# Altium PCB OpenRex_V1I1_PCB.PcbDoc (part 6 of 12)
Units mm, origin at the board's own origin, x right, y up, seen from the top; angles counter-clockwise.
Board outline 70 x 95 mm, 10 copper layers (L1, L2, L3, L4 (PWR), L5 (PWR), L6 (PWR), L7 (PWR), L8, L9, L10), stack 1.632 mm thick; 1080 components, 708 nets, 3831 pads, 2373 vias.
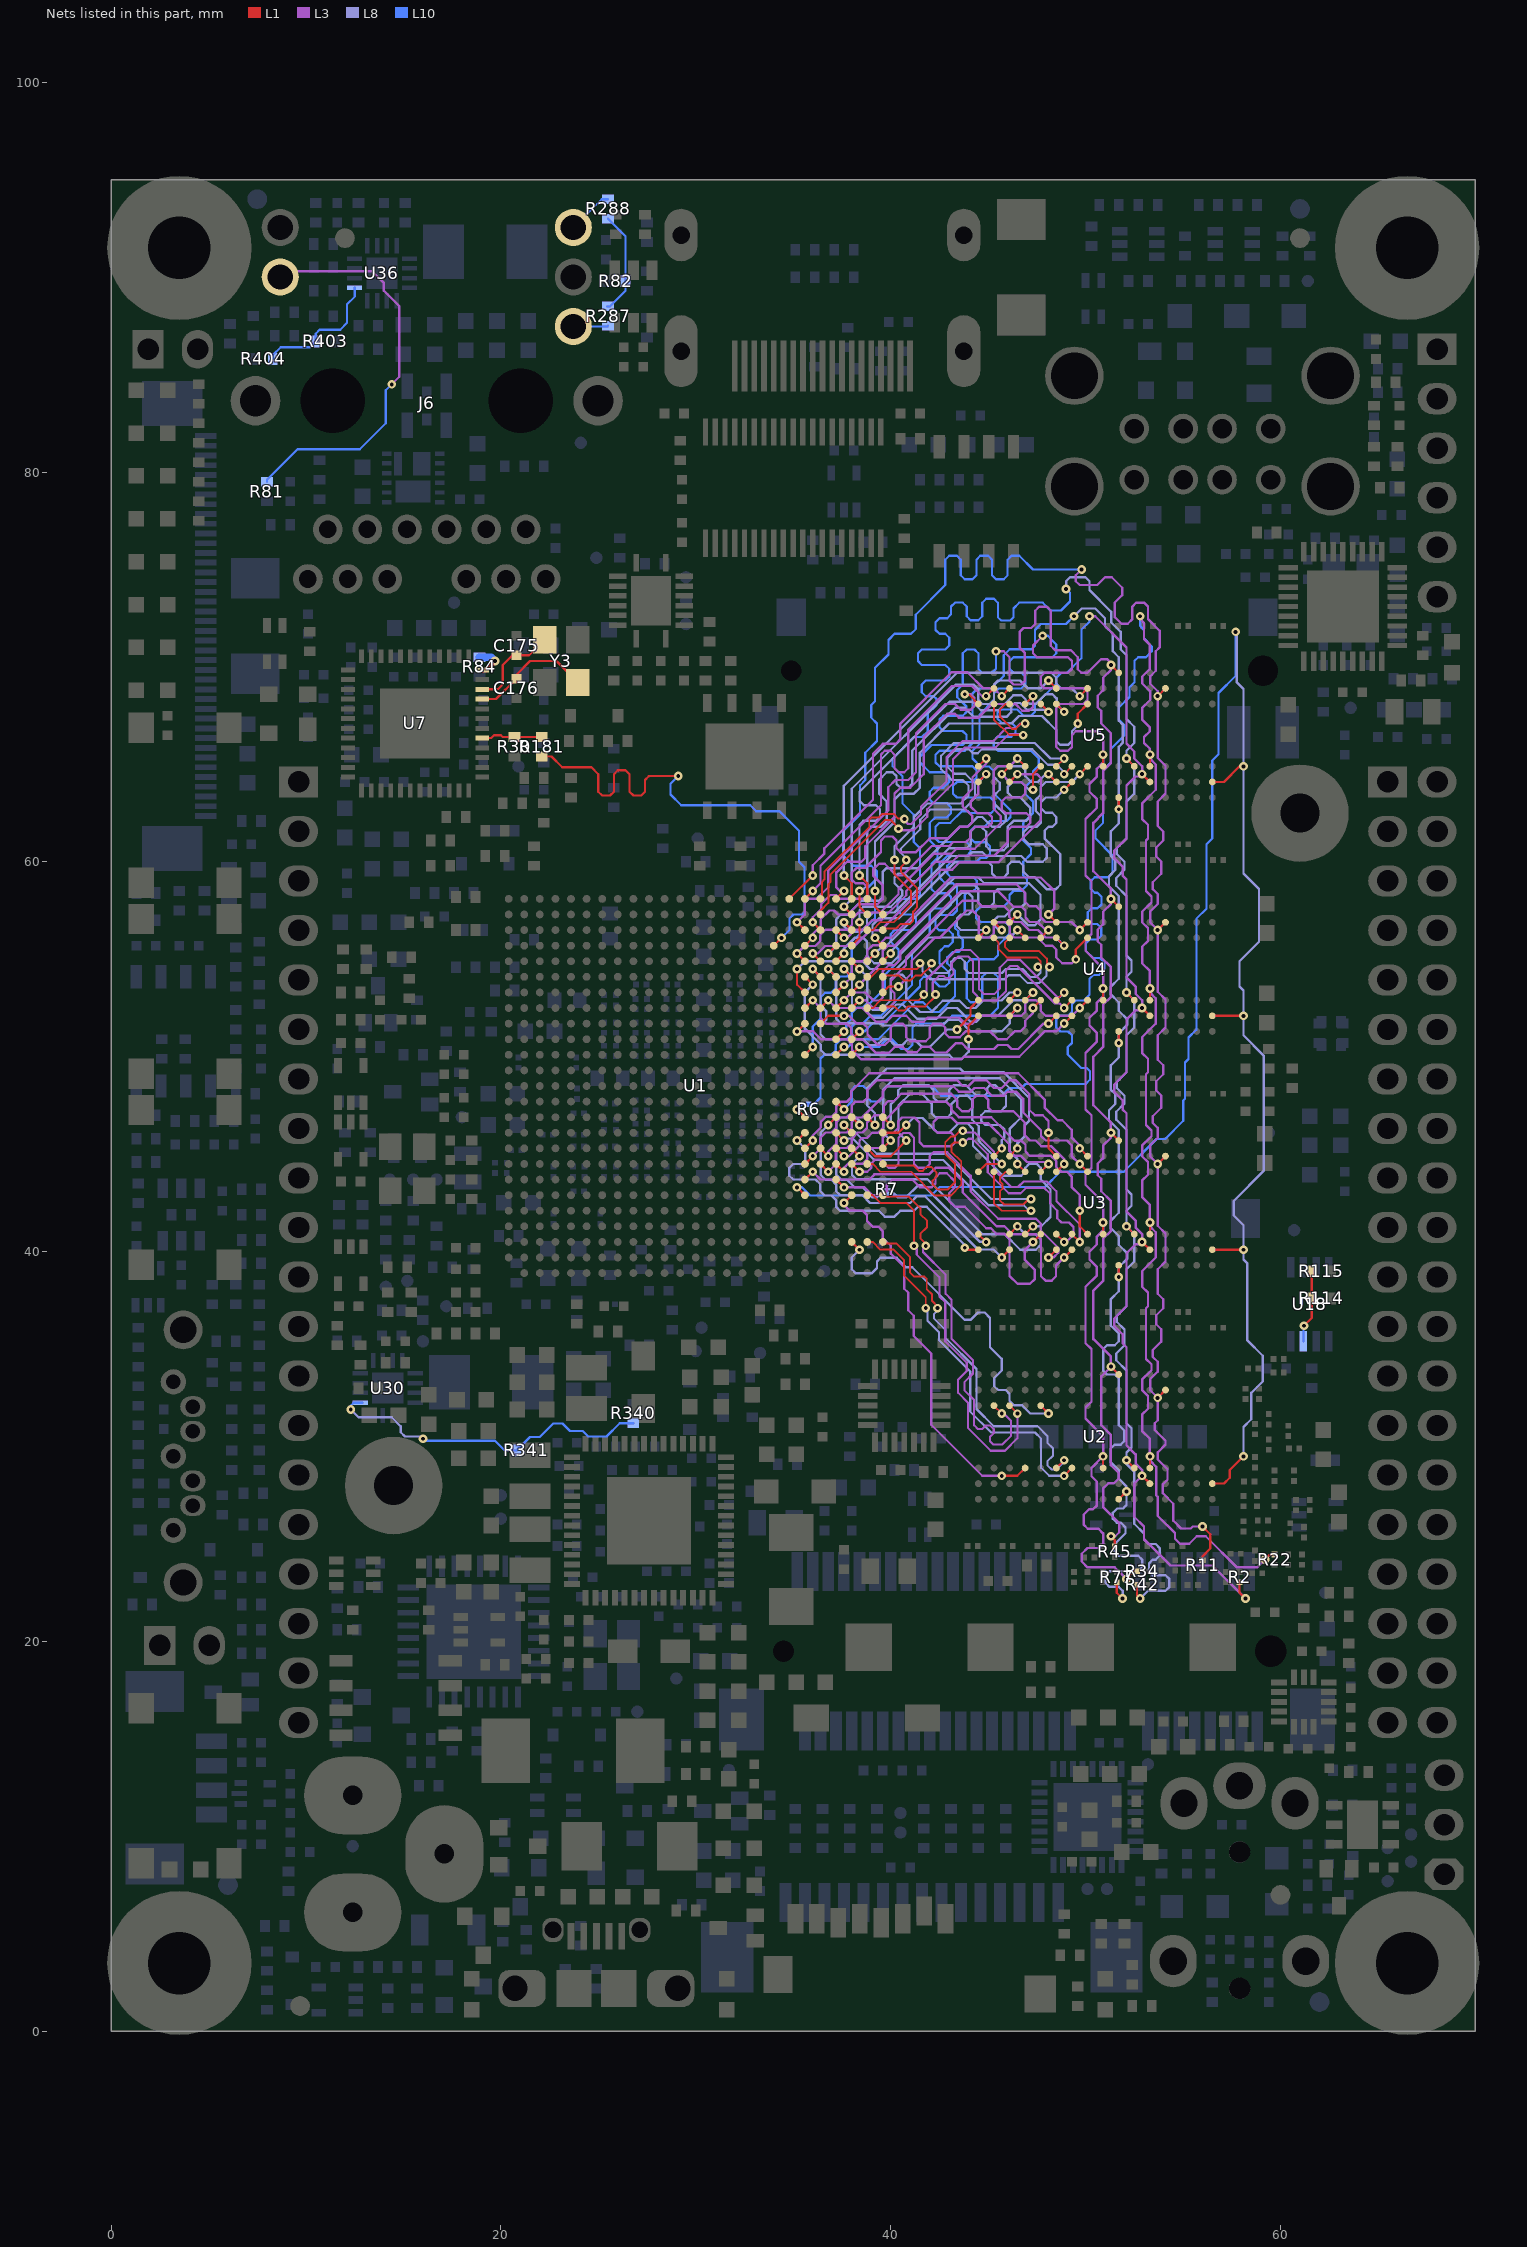
[diagram p14: the nets of this part, all layers, seen from the top]

## Via types
v1: diameter 0.45, hole 0.2, L1 to L10, tented both sides, 2369 vias
v2: diameter 1, hole 0.5, L1 to L10, tented top, 4 vias

## Nets (pads, with @x,y where several pads share a name; then routed paths per layer and width w, separated by ;. In a path a pad name is that pad's centre, name@x,y a point inside that pad or via, vN(x,y) a via of type N, cw(c..) or ccw(c..) an arc to the next point about the centre after c; other vN are vias at no path point) (continued)
DRAM_D16: U1.AB7 U3.E3 | length 19.1
  L1 w0.114: U1.AB7@37.2,43.7 v1(37.6,43.3) ; v1(47.3,40.5) U3.E3@47.7,40.9
  L3 w0.12: v1(37.6,43.3) 38.656,43.3 39.056,42.9 39.6,42.9 39.793,43.093 39.793,43.393 40.085,43.685 41.115,43.685 41.5,43.3 42.1,43.3 42.3,43.5 42.3,43.8 42.52,44.02 42.88,44.02 43.3,43.6 43.3,43.3 43,43 43,42.6 43.3,42.3 43.8,42.3 44.9,41.2 45.14,41.2 45.418,40.922 45.822,40.922 46.1,40.644 46.1,38.756 46.506,38.35 47.15,38.35 47.4,38.6 47.4,39.055 46.885,39.571 46.885,40.085 v1(47.3,40.5)
DRAM_D17: U1.AA8 U3.F7 | length 19.1
  L1 w0.114: U1.AA8@36.4,44.5 v1(36.8,44.1) ; U3.F7@48.5,44.1 v1(48.9,44.5)
  L3 w0.12: v1(36.8,44.1) 37.185,44.485 37.185,45.085 37.415,45.315 37.759,45.315 38.009,45.565 38.009,45.809 38.315,46.115 38.559,46.115 38.785,46.341 38.785,46.629 39.156,47 39.5,47 39.656,47.156 39.656,47.5 39.871,47.715 40.159,47.715 40.544,48.1 43.1,48.1 43.415,47.785 43.415,47.441 43.656,47.2 44,47.2 44.215,47.415 44.215,47.815 44.385,47.985 44.815,47.985 45,47.8 45,47.4 45.2,47.2 46.3,47.2 46.885,46.615 46.885,45.971 47.155,45.7 47.444,45.7 47.685,45.459 47.744,45.4 48.255,45.4 48.9,44.755 v1(48.9,44.5)
DRAM_D18: U1.AB9 U3.H3 | length 19.1
  L1 w0.114: U1.AB9@37.2,45.3 v1(37.6,44.9) ; v1(49.7,42.1) 49.7,41.3 U3.H3@50.1,40.9
  L3 w0.12: v1(37.6,44.9) 37.856,44.9 38.4,45.444 38.4,45.7 38.535,45.835 38.791,45.835 39.056,46.1 39.344,46.1 39.615,46.371 39.615,46.659 40.656,47.7 42.844,47.7 43.1,47.444 43.1,47.3 43.5,46.9 45.155,46.9 46.371,45.685 46.715,45.685 46.915,45.485 46.915,45.141 47.141,44.915 48.229,44.915 48.5,44.644 48.5,44.356 48.771,44.085 49.059,44.085 49.285,43.859 49.285,43.315 49.7,42.9 v1(49.7,42.1)
DRAM_D19: U1.Y9 U3.H8 | length 19.1
  L1 w0.114: U1.Y9@35.6,45.3 v1(36,45.7) ; v1(49.7,45.3) U3.H8@50.1,44.9
  L3 w0.12: v1(36,45.7) 36,45.956 36.415,46.371 36.415,46.659 36.671,46.915 36.959,46.915 37.215,47.171 37.215,47.459 37.441,47.685 37.729,47.685 37.985,47.941 37.985,48.229 38.906,49.15 46.55,49.15 47.9,47.8 47.9,47.4 48.556,46.744 48.8,46.744 49.285,46.259 49.285,45.855 49.7,45.44 v1(49.7,45.3)
DRAM_D20: U1.Y7 U3.G2 | length 19.1
  L1 w0.114: U1.Y7@35.6,43.7 v1(36,44.1) ; v1(48.9,39.7) U3.G2@49.3,40.1
  L3 w0.12: v1(36,44.1) 36.4,43.7 38.9,43.7 39.165,43.965 41.965,43.965 42.3,44.3 43,44.3 43.7,43.6 43.7,43.036 45.436,41.3 45.84,41.3 46.255,40.885 47.459,40.885 47.715,40.629 47.715,38.741 47.941,38.515 48.259,38.515 48.485,38.741 48.485,39.285 v1(48.9,39.7)
DRAM_D21: U1.Y8 U3.F8 | length 19.1
  L1 w0.114: U1.Y8@35.6,44.5 v1(36,44.9) ; v1(48.1,46.1) 48.1,45.3 U3.F8@48.5,44.9
  L3 w0.12: v1(36,44.9) 36.385,45.285 36.385,45.829 36.671,46.115 36.959,46.115 37.215,46.371 37.215,46.659 37.441,46.885 37.729,46.885 38,47.156 38,47.5 38.2,47.7 38.6,47.7 38.8,47.9 38.8,48.285 39.315,48.8 43.4,48.8 43.7,48.5 44,48.5 44.3,48.8 44.9,48.8 45.3,48.4 45.7,48.4 46.1,48.8 46.4,48.8 47.115,48.085 47.115,47.285 47.4,47 47.8,47 48.1,46.7 v1(48.1,46.1)
DRAM_D22: U1.AC8 U3.F2 | length 19.1
  L1 w0.114: U1.AC8@38,44.5 v1(38.4,44.1) ; v1(48.1,39.7) U3.F2@48.5,40.1
  L3 w0.12: v1(38.4,44.1) 38.8,44.1 39,44.3 39,44.525 39.2,44.725 39.475,44.725 39.9,44.3 40.205,44.3 40.4,44.495 40.4,45.844 40.641,46.085 40.959,46.085 41.2,45.844 41.2,44.5 41.4,44.3 41.8,44.3 42,44.5 42,44.9 42.2,45.1 42.9,45.1 44.1,43.9 44.1,43.1 45.515,41.685 47.459,41.685 47.7,41.444 47.7,41.1 48.6,40.2 48.6,39.944 48.356,39.7 v1(48.1,39.7)
DRAM_D23: U1.AA9 U3.H7 | length 19.1
  L1 w0.114: U1.AA9@36.4,45.3 v1(36.8,44.9) ; v1(49.7,44.5) U3.H7@50.1,44.1
  L3 w0.12: v1(36.8,44.9) 36.8,45.14 37.2,45.54 37.2,45.9 37.415,46.115 37.759,46.115 38,46.356 38,46.644 38.241,46.885 38.529,46.885 39.6,47.956 39.6,48.244 39.841,48.485 43.215,48.485 43.5,48.2 44.1,48.2 44.3,48.4 44.8,48.4 45.2,48 45.8,48 46,48.2 46.449,48.2 46.8,47.849 46.8,47.144 47.715,46.229 47.715,45.941 47.956,45.7 49.044,45.7 49.285,45.459 49.285,44.915 v1(49.7,44.5)
DRAM_D24: U1.AE9 U3.D7 | length 15.4
  L1 w0.114: U1.AE9@39.6,45.3 v1(40,45.7) ; v1(46.5,44.5) U3.D7@46.9,44.1
  L8 w0.12: v1(40,45.7) 39.615,46.085 39.615,48.315 40.2,48.9 45.6,48.9 46.7,47.8 46.7,46.9 46.115,46.315 46.115,45.141 46.5,44.756 v1(46.5,44.5)
DRAM_D25: U1.Y10 U3.A2 | length 15.4
  L1 w0.114: v1(35.2,45.7) U1.Y10@35.6,46.1 ; v1(43.8,40.2) 43.9,40.1 U3.A2@44.5,40.1
  L8 w0.12: v1(35.2,45.7) 35.615,45.285 35.615,44.6 35.515,44.5 35,44.5 34.8,44.3 34.8,43.9 35,43.7 36.144,43.7 36.385,43.459 36.385,43.115 36.615,42.885 36.959,42.885 37.215,42.629 37.215,42.285 37.4,42.1 39.4,42.1 39.7,41.8 40.2,41.8 40.5,42.1 41.2,42.1 41.4,42.3 41.844,42.3 43.8,40.344 v1(43.8,40.2)
DRAM_D26: U1.AE11 U3.B8 | length 15.4
  L1 w0.114: U1.AE11@39.6,46.9 v1(40,46.5) ; U3.B8@45.3,44.9 v1(45.7,45.3)
  L8 w0.12: v1(40,46.5) 40,47.556 40.385,47.941 40.385,48.285 40.645,48.545 41.955,48.545 42.2,48.3 42.2,47.9 42.4,47.7 42.8,47.7 43,47.9 43,48.3 43.245,48.545 43.855,48.545 44.4,48 44.8,48 44.955,48.155 44.955,48.4 45.1,48.545 45.355,48.545 45.915,47.985 45.915,47.471 45.644,47.2 44.85,47.2 44.65,47 44.65,46.7 44.85,46.5 45.6,46.5 45.835,46.265 45.835,45.854 45.7,45.719 v1(45.7,45.3)
DRAM_D27: U1.AB11 U3.C2 | length 15.4
  L1 w0.114: v1(36.8,46.5) U1.AB11@37.2,46.9 ; v1(45.7,39.7) U3.C2@46.1,40.1
  L8 w0.12: v1(36.8,46.5) 36.415,46.115 36.415,43.941 36.671,43.685 36.959,43.685 37.2,43.444 37.2,43.1 37.4,42.9 38.544,42.9 38.944,42.5 41,42.5 41.35,42.85 41.75,42.85 44.485,40.115 45.285,40.115 v1(45.7,39.7)
DRAM_D28: U1.AC9 U3.C3 | length 15.4
  L1 w0.114: U1.AC9@38,45.3 v1(38.4,44.9) ; U3.C3@46.1,40.9 v1(46.5,41.3)
  L8 w0.12: v1(38.4,44.9) 38.015,44.515 38.015,43.941 38.241,43.715 41.885,43.715 44.7,40.9 45.844,40.9 46.644,40.1 47.444,40.1 47.685,40.341 47.685,40.659 47.459,40.885 46.915,40.885 v1(46.5,41.3)
DRAM_D29: U1.AD9 U3.A7 | length 15.4
  L1 w0.114: U1.AD9@38.8,45.3 39.2,44.9 40,44.9 v1(40.8,45.7) ; U3.A7@44.5,44.1 44.9,44.5 v1(45.7,44.5)
  L8 w0.12: v1(40.8,45.7) 40.4,46.1 40.4,47.5 41,48.1 41.6,48.1 42.1,47.6 42.1,47.1 42.3,46.9 42.928,46.9 43.1,47.072 43.1,47.553 43.547,48 43.944,48 44.185,47.759 44.185,46.769 44.515,46.439 44.515,45.685 v1(45.7,44.5)
DRAM_D30: U1.AD11 U3.C8 | length 15.4
  L1 w0.114: U1.AD11@38.8,46.9 v1(39.2,46.5) ; U3.C8@46.1,44.9 v1(46.5,45.3)
  L8 w0.12: v1(39.2,46.5) 39.2,47.1 38.8,47.5 38.8,48.4 39.8,49.4 43.556,49.4 43.741,49.215 45.785,49.215 47.1,47.9 47.1,46.7 46.885,46.485 46.885,45.941 46.5,45.556 v1(46.5,45.3)
DRAM_D31: U1.AC11 U3.A3 | length 15.4
  L1 w0.114: U1.AC11@38,46.9 v1(38.4,46.5) ; U3.A3@44.5,40.9 v1(44.9,40.5)
  L8 w0.12: v1(38.4,46.5) 38.4,46.7 38.215,46.885 37.385,46.885 37.2,46.7 37.2,43.956 37.471,43.685 37.759,43.685 38.144,43.3 38.54,43.3 39.04,42.8 39.3,42.8 39.7,43.2 39.956,43.2 40.356,42.8 40.8,42.8 41.4,43.4 41.69,43.4 44.59,40.5 v1(44.9,40.5)
DRAM_D32: U1.AA17 U4.E3 | length 16.3
  L1 w0.114: U1.AA17@36.4,51.7 36.8,52.1 v1(37.6,52.1) ; v1(47.3,52.5) U4.E3@47.7,52.9
  L3 w0.12: v1(37.6,52.1) 37.856,52.1 38.241,51.715 38.585,51.715 38.815,51.485 38.815,51.141 39.356,50.6 39.7,50.6 40,50.9 40,51.5 40.2,51.7 40.6,51.7 40.8,51.5 40.8,51 41,50.8 41.8,50.8 42,51 42,51.5 42.2,51.7 42.6,51.7 42.8,51.5 42.8,51.2 43,51 43.544,51 43.844,51.3 45.1,51.3 45.5,50.9 45.956,50.9 46.356,51.3 46.644,51.3 46.9,51.556 46.9,51.844 47.3,52.244 v1(47.3,52.5)
DRAM_D33: U1.AA18 U4.H3 | length 16.4
  L1 w0.114: U1.AA18@36.4,52.5 v1(36.8,52.9) ; v1(49.7,52.5) U4.H3@50.1,52.9
  L3 w0.12: v1(36.8,52.9) 37.2,52.5 38.544,52.5 39.244,51.8 39.8,51.8 40.1,52.1 40.8,52.1 41.1,51.8 41.7,51.8 41.915,52.015 43.5,52.015 43.815,51.7 44.2,51.7 44.6,52.1 46.7,52.1 46.9,52.3 46.9,52.7 47.1,52.9 47.444,52.9 47.7,52.644 47.7,52.35 47.95,52.1 49.3,52.1 v1(49.7,52.5)
DRAM_D34: U1.AC18 U4.F7 | length 16.4
  L1 w0.114: U1.AC18@38,52.5 v1(38.4,52.9) ; U4.F7@48.5,56.1 v1(48.9,55.7)
  L3 w0.12: v1(38.4,52.9) 38.7,52.9 39.1,52.5 39.9,52.5 40.2,52.8 40.2,53.256 40.015,53.441 40.015,53.915 40.79,54.69 40.79,55.1 43.69,58 44.4,58 44.685,57.715 45.829,57.715 46.085,57.459 46.085,57.171 46.341,56.915 46.685,56.915 47.1,56.5 47.555,56.5 47.941,56.115 48.485,56.115 v1(48.9,55.7)
DRAM_D35: U1.AE19 U4.H7 | length 16.3
  L1 w0.114: U1.AE19@39.6,53.3 39.9,53.6 v1(40.4,53.6) ; v1(49.5,55) 49.5,55.5 U4.H7@50.1,56.1
  L3 w0.12: v1(40.4,53.6) 41.08,54.28 41.08,54.924 42.256,56.1 42.5,56.1 43.9,57.5 44.2,57.5 44.515,57.185 44.515,56.341 44.741,56.115 45.059,56.115 45.285,56.341 45.285,56.685 45.5,56.9 45.9,56.9 46.115,56.685 46.115,56.341 46.341,56.115 47.545,56.115 47.96,55.7 48.3,55.7 48.5,55.5 48.5,55.1 48.8,54.8 49.3,54.8 v1(49.5,55)
DRAM_D36: U1.Y17 U4.G2 | length 16.3
  L1 w0.114: v1(35.2,51.3) U1.Y17@35.6,51.7 ; v1(48.9,51.7) U4.G2@49.3,52.1
  L3 w0.12: v1(35.2,51.3) 36.03,51.3 36.43,50.9 37.744,50.9 38.015,50.629 38.015,50.341 38.481,49.875 43.631,49.875 43.756,50 46.6,50 47.9,51.3 48.5,51.3 v1(48.9,51.7)
DRAM_D37: U1.Y18 U4.F2 | length 16.3
  L1 w0.114: U1.Y18@35.6,52.5 v1(36,52.9) ; v1(48.1,51.7) U4.F2@48.5,52.1
  L3 w0.12: v1(36,52.9) 36.4,52.5 36.4,52 36.715,51.685 37.759,51.685 37.985,51.459 37.985,51.171 38.256,50.9 38.544,50.9 39.244,50.2 39.9,50.2 40.215,50.515 40.613,50.515 40.893,50.235 41.335,50.235 41.615,50.515 41.985,50.515 42.285,50.215 42.871,50.215 43.356,50.7 43.644,50.7 43.944,50.4 45.3,50.4 45.5,50.6 46,50.6 46.2,50.4 46.544,50.4 47.844,51.7 v1(48.1,51.7)
DRAM_D38: U1.AB19 U4.F8 | length 16.3
  L1 w0.114: U1.AB19@37.2,53.3 v1(37.6,53.7) ; v1(48.1,57.3) U4.F8@48.5,56.9
  L3 w0.12: v1(37.6,53.7) 38,54.1 38,54.7 38.2,54.9 38.544,54.9 38.815,55.171 38.815,55.459 39.071,55.715 39.359,55.715 39.744,56.1 40,56.1 43.1,59.2 47.7,59.2 48.4,58.5 48.4,57.6 v1(48.1,57.3)
DRAM_D39: U1.AC19 U4.H8 | length 16.3
  L1 w0.114: U1.AC19@38,53.3 v1(38.4,53.7) ; v1(49.7,56.5) U4.H8@50.1,56.9
  L3 w0.12: v1(38.4,53.7) 39.585,54.885 39.585,55.429 39.856,55.7 40.2,55.7 43.35,58.85 46.45,58.85 46.9,58.4 46.9,57.955 47.141,57.715 47.47,57.715 47.685,57.5 47.685,57.171 47.941,56.915 49.285,56.915 v1(49.7,56.5)
DRAM_D40: U1.Y19 U4.D7 | length 14.4
  L1 w0.114: v1(35.2,54.5) 35.2,53.7 U1.Y19@35.6,53.3 ; v1(46.5,56.5) U4.D7@46.9,56.1
  L8 w0.12: v1(35.2,54.5) 35.6,54.9 38.544,54.9 38.944,54.5 40.3,54.5 41.915,56.115 46.115,56.115 v1(46.5,56.5)
DRAM_D41: U1.AB20 U4.C2 | length 14.4
  L1 w0.114: v1(36.8,54.5) U1.AB20@37.2,54.1 ; U4.C2@46.1,52.1 v1(46.5,52.5)
  L8 w0.12: v1(36.8,54.5) 37.215,54.085 37.215,51.941 37.441,51.715 39.485,51.715 39.6,51.6 42.64,51.6 42.94,51.9 43.5,51.9 44.1,51.3 45.7,51.3 46.115,51.715 46.115,52.115 v1(46.5,52.5)
DRAM_D42: U1.AB21 U4.A7 | length 14.4
  L1 w0.114: U1.AB21@37.2,54.9 v1(37.6,55.3) ; U4.A7@44.5,56.1 v1(44.9,56.5)
  L8 w0.12: v1(37.6,55.3) 37.6,55.556 38.144,56.1 38.6,56.1 38.785,55.915 38.785,55.178 ; 38.781,55.174 39.156,54.8 40.044,54.8 43.644,58.4 44,58.4 44.2,58.2 44.2,57.5 44,57.3 43.6,57.3 43.4,57.1 43.4,56.7 43.6,56.5 v1(44.9,56.5)
DRAM_D43: U1.AD21 U4.C8 | length 14.4
  L1 w0.114: U1.AD21@38.8,54.9 v1(39.2,55.3) ; U4.C8@46.1,56.9 v1(46.5,57.3)
  L8 w0.12: v1(39.2,55.3) 39.6,55.7 39.785,55.7 43.285,59.2 44.5,59.2 44.8,58.9 47.1,58.9 47.685,58.315 47.685,57.035 47.4,56.75 47.05,56.75 v1(46.5,57.3)
DRAM_D44: U1.Y20 U4.A2 | length 14.4
  L1 w0.114: U1.Y20@35.6,54.1 v1(36,53.7) ; v1(44,50.9) 44,51.6 U4.A2@44.5,52.1
  L8 w0.12: v1(36,53.7) 35.6,53.3 35.6,51.444 36.415,50.629 36.415,50.341 36.656,50.1 43,50.1 43.2,49.9 43.644,49.9 44,50.256 v1(44,50.9)
DRAM_D45: U1.AA20 U4.A3 | length 14.4
  L1 w0.114: v1(36,54.5) U1.AA20@36.4,54.1 ; v1(43.4,51.4) 44.1,52.1 44.1,52.5 U4.A3@44.5,52.9
  L8 w0.12: v1(36,54.5) 36.4,54.1 36.4,52.628 36.7,52.328 36.7,51.9 36.4,51.6 36.4,51.156 36.656,50.9 38.6,50.9 38.9,50.6 39.3,50.6 39.6,50.9 39.9,50.9 40.2,50.6 40.6,50.6 40.878,50.878 41.222,50.878 41.6,50.5 42,50.5 42.9,51.4 v1(43.4,51.4)
DRAM_D46: U1.AE21 U4.B8 | length 14.4
  L1 w0.114: U1.AE21@39.6,54.9 v1(40,55.3) ; U4.B8@45.3,56.9 v1(45.7,56.5)
  L8 w0.12: v1(40,55.3) 40,55.4 43.4,58.8 44.3,58.8 44.5,58.6 44.5,57.9 44.7,57.7 45.1,57.7 45.3,57.9 45.3,58.4 45.5,58.6 46.7,58.6 46.885,58.415 46.885,57.86 46.71,57.685 46.341,57.685 45.856,57.2 45.5,57.2 45.3,57 45.3,56.744 45.544,56.5 v1(45.7,56.5)
DRAM_D47: U1.AC21 U4.C3 | length 14.4
  L1 w0.114: U1.AC21@38,54.9 v1(38.4,54.5) ; U4.C3@46.1,52.9 v1(46.5,53.3)
  L8 w0.12: v1(38.4,54.5) 38.8,54.1 38.8,52.7 39.1,52.4 39.5,52.4 40,52.9 40,54 40.2,54.2 40.6,54.2 40.8,54 40.8,53 41.5,52.3 42.1,52.3 42.675,52.875 43.525,52.875 43.9,52.5 44.356,52.5 44.741,52.885 45.685,52.885 46.1,53.3 v1(46.5,53.3)
DRAM_D48: U1.AC22 U5.E3 | length 21.7
  L1 w0.114: U1.AC22@38,55.7 38.4,56.1 v1(38.4,56.9) ; v1(47.3,63.7) 47.3,64.5 U5.E3@47.7,64.9
  L8 w0.12: v1(38.4,56.9) 38.4,57.5 38.6,57.7 40,57.7 40.6,58.3 40.6,58.5 40.2,58.9 40.2,59.2 40.4,59.4 40.7,59.4 41.1,59 41.3,59 43,60.7 43.9,60.7 44.1,60.9 44.1,61.544 44.341,61.785 44.659,61.785 44.9,61.544 44.9,60.8 45.1,60.6 45.8,60.6 46,60.8 46,61.8 46.3,62.1 46.955,62.1 47.155,62.3 47.155,62.789 46.629,63.315 46.24,63.315 46.015,63.541 46.015,63.859 46.24,64.085 46.715,64.085 47.1,63.7 v1(47.3,63.7)
DRAM_D49: U1.AE22 U5.G2 | length 21.7
  L1 w0.114: v1(39.2,56.1) U1.AE22@39.6,55.7 ; v1(48.9,63.7) U5.G2@49.3,64.1
  L8 w0.12: v1(39.2,56.1) 39.065,56.235 39.065,56.765 39.4,57.1 40.41,57.1 43.295,59.985 45.015,59.985 45.2,59.8 45.2,59.4 45.4,59.2 45.8,59.2 46,59.4 46,59.8 46.2,60 46.6,60 46.8,59.8 46.8,59.5 47.085,59.215 47.385,59.215 48,58.6 48.475,58.6 48.7,58.825 48.7,60.4 47.9,61.2 47.9,61.6 48.1,61.8 48.3,61.8 48.5,62 48.5,62.3 48.285,62.515 47.941,62.515 47.715,62.741 47.715,63.059 47.956,63.3 48.5,63.3 v1(48.9,63.7)
DRAM_D50: U1.AE24 U5.H7 | length 21.7
  L1 w0.114: v1(39.2,58.5) 39.2,57.7 U1.AE24@39.6,57.3 ; v1(49.6,67.1) 49.6,67.6 U5.H7@50.1,68.1
  L8 w0.12: v1(39.2,58.5) 39.2,61.044 40.2,62.044 40.2,63.2 40.5,63.5 41.2,63.5 41.5,63.8 41.5,65.6 43,67.1 46.2,67.1 46.585,67.485 47.771,67.485 48.5,66.756 48.5,66.2 48.7,66 49.1,66 49.3,66.2 49.3,66.7 49.6,67 v1(49.6,67.1)
DRAM_D51: U1.AC24 U5.F8 | length 21.7
  L1 w0.114: v1(37.6,57.7) U1.AC24@38,57.3 ; v1(48.1,69.3) U5.F8@48.5,68.9
  L8 w0.12: v1(37.6,57.7) 38,58.1 38,63.75 43.35,69.1 44.25,69.1 44.5,68.85 44.5,68.3 44.7,68.1 45.1,68.1 45.3,68.3 45.3,69.1 45.507,69.307 46.633,69.307 47.025,68.915 47.715,68.915 v1(48.1,69.3)
DRAM_D52: U1.AB22 U5.F2 | length 21.7
  L1 w0.114: v1(36.8,55.3) U1.AB22@37.2,55.7 ; v1(48.1,64.5) U5.F2@48.5,64.1
  L8 w0.12: v1(36.8,55.3) 36.83,55.3 37.2,55.67 37.2,57.044 37.441,57.285 37.785,57.285 38.5,58 39.4,58 39.585,58.185 39.585,59.485 39.78,59.68 41.424,59.68 43.559,61.815 43.975,61.815 44.46,62.3 44.7,62.3 45.2,61.8 45.6,61.8 45.9,62.1 45.9,62.4 45.3,63 45.3,63.4 45.6,63.7 45.6,64.056 45.3,64.356 45.3,64.7 45.5,64.9 46.7,64.9 46.9,64.7 46.9,64.4 47.2,64.1 47.56,64.1 47.96,64.5 v1(48.1,64.5)
DRAM_D53: U1.AC23 U5.H3 | length 21.7
  L1 w0.114: v1(37.6,56.9) U1.AC23@38,56.5 ; v1(49.7,64.5) U5.H3@50.1,64.9
  L8 w0.12: v1(37.6,56.9) 37.6,56.7 37.9,56.4 38.444,56.4 38.785,56.741 38.785,57.085 39.1,57.4 40.2,57.4 43.1,60.3 44,60.3 44.2,60.5 44.7,60.5 44.9,60.3 46.696,60.3 46.996,60 47.8,60 48,60.2 48,60.7 47.8,60.9 47.1,60.9 46.8,61.2 46.8,61.5 47.1,61.8 47.5,61.8 47.7,62 47.7,62.36 47.435,62.625 47.435,63.175 47.7,63.44 47.7,63.844 47.956,64.1 49.3,64.1 v1(49.7,64.5)
DRAM_D54: U1.AD25 U5.F7 | length 21.7
  L1 w0.114: v1(38.4,59.3) 38.8,58.9 U1.AD25@38.8,58.1 ; U5.F7@48.5,68.1 v1(48.9,67.7)
  L8 w0.12: v1(38.4,59.3) 38.4,61.9 38.6,62.1 39.25,62.1 39.45,62.3 39.45,62.7 39.25,62.9 38.625,62.9 38.4,63.125 38.4,63.596 43.019,68.215 44.185,68.215 44.623,67.777 45.521,67.777 46.294,68.55 46.705,68.55 47.141,68.115 47.459,68.115 47.944,68.6 48.3,68.6 48.515,68.385 48.515,68.085 v1(48.9,67.7)
DRAM_D55: U1.AC25 U5.H8 | length 21.7
  L1 w0.114: v1(37.6,59.3) 38,58.9 U1.AC25@38,58.1 ; v1(49.7,68.5) U5.H8@50.1,68.9
  L8 w0.12: v1@37.6,59.3 37.6,63.9 43.4,69.7 48.244,69.7 48.5,69.444 48.5,69.156 48.756,68.9 49.3,68.9 v1(49.7,68.5)
DRAM_D56: U1.AB25 U5.D7 | length 19.1
  L1 w0.114: U1.AB25@37.2,58.1 v1(37.6,58.5) ; U5.D7@46.9,68.1 v1(47.3,68.5)
  L3 w0.12: v1(37.6,58.5) 37.4,58.5 37.215,58.685 37.215,59.459 37.756,60 38.5,60 38.7,60.2 38.7,60.8 40.2,62.3 40.2,63.5 40.5,63.8 41,63.8 41.7,64.5 41.7,66.4 42.9,67.6 43.3,67.6 43.5,67.4 44.5,67.4 45.2,68.1 46.4,68.1 46.75,67.75 47.1,67.75 47.3,67.95 v1(47.3,68.5)
DRAM_D57: U1.AA21 U5.C2 | length 19.1
  L1 w0.114: v1(36,55.3) U1.AA21@36.4,54.9 ; U5.C2@46.1,64.1 v1(46.5,64.5)
  L3 w0.12: v1(36,55.3) 36.256,55.3 36.641,55.685 38.14,55.685 38.94,56.485 39.485,56.485 42.6,59.6 43.156,59.6 43.541,59.985 45.541,59.985 47.715,62.159 47.715,64.285 47.5,64.5 v1(46.5,64.5)
DRAM_D58: U1.Y25 U5.B8 | length 19.1
  L1 w0.114: U1.Y25@35.6,58.1 v1(36,58.5) ; v1(44.9,68.5) U5.B8@45.3,68.9
  L3 w0.12: v1(36,58.5) 36.4,58.9 36.4,59.8 39.5,62.9 39.5,65.5 39.7,65.7 40,65.7 40.2,65.5 40.2,64.8 40.4,64.6 40.7,64.6 40.9,64.8 40.9,66.79 43.135,69.025 44.171,69.025 44.696,68.5 v1(44.9,68.5)
DRAM_D59: U1.Y22 U5.A2 | length 19.1
  L1 w0.114: U1.Y22@35.6,55.7 v1(36,56.1) ; U5.A2@44.5,64.1 v1(44.9,64.5)
  L3 w0.12: v1(36,56.1) 36,56.3 36.415,56.715 36.415,57.059 36.856,57.5 37.1,57.5 37.3,57.3 37.8,57.3 38.325,57.825 39.325,57.825 39.585,58.085 39.585,58.815 39.1,59.3 39.1,59.6 39.4,59.9 39.7,59.9 40.3,59.3 40.6,59.3 42.111,60.811 43.011,60.811 43.215,61.015 43.859,61.015 44.085,61.241 44.085,61.545 44.34,61.8 45,61.8 45.2,62 45.2,62.3 45,62.5 44.44,62.5 44.1,62.84 44.1,63.1 44.5,63.5 44.5,64.1 v1(44.9,64.5)
DRAM_D60: U1.AB23 U5.C3 | length 19.1
  L1 w0.114: U1.AB23@37.2,56.5 v1(37.6,56.1) ; v1(45.7,64.5) U5.C3@46.1,64.9
  L3 w0.12: v1(37.6,56.1) 37.755,56.1 38.17,56.515 38.559,56.515 39.044,57 39.51,57 40.8,58.29 40.8,58.5 42.302,60.002 ; 42.302,60.004 43.162,60.004 ; 43.162,60.002 43.488,60.328 45.328,60.328 46,61 46,61.6 46.2,61.8 46.96,61.8 47.16,62 47.16,62.3 46.96,62.5 45.9,62.5 45.7,62.7 45.7,63.1 45.9,63.3 46.7,63.3 46.9,63.5 46.9,63.9 46.7,64.1 46.1,64.1 v1(45.7,64.5)
DRAM_D61: U1.AA23 U5.A3 | length 19.1
  L1 w0.114: v1(36,56.9) U1.AA23@36.4,56.5 ; U5.A3@44.5,64.9 v1(44.9,65.3)
  L3 w0.12: v1(36,56.9) 36,57.156 36.434,57.589 36.434,57.834 36.9,58.3 37.2,58.3 37.385,58.115 38.615,58.115 38.8,58.3 38.8,58.7 38.6,58.9 38.2,58.9 38,59.1 38,59.444 38.241,59.685 38.685,59.685 39.5,60.5 39.5,61.1 39.7,61.3 40.1,61.3 40.3,61.1 40.3,60.7 40.5,60.5 41.3,60.5 42.015,61.215 42.971,61.215 43.556,61.8 43.944,61.8 44.185,62.041 44.185,62.359 43.7,62.844 43.7,63.256 44.2,63.756 44.2,64.344 44.9,65.044 v1(44.9,65.3)
DRAM_D62: U1.Y23 U5.A7 | length 19.1
  L1 w0.114: v1(35.2,56.9) U1.Y23@35.6,56.5 ; v1(43.8,68.6) 44,68.6 U5.A7@44.5,68.1
  L3 w0.12: v1(35.2,56.9) 35.585,57.285 35.585,57.885 35.8,58.1 36.2,58.1 36.8,58.7 36.8,59.556 39.88,62.636 39.88,63.83 40.25,64.2 40.9,64.2 41.3,64.6 41.3,66.6 42.8,68.1 43.3,68.1 43.6,67.8 44.1,67.8 44.3,68 44.3,68.4 44.1,68.6 v1(43.8,68.6)
DRAM_D63: U1.W25 U5.C8 | length 19.1
  L1 w0.114: U1.W25@34.8,58.1 v1(36,59.3) ; v1(45.7,68.5) U5.C8@46.1,68.9
  L3 w0.12: v1(36,59.3) 36,59.83 36.6,60.43 36.6,60.7 39.09,63.19 39.09,65.546 39.6,66.056 40.256,66.056 40.5,66.3 40.5,67.1 43.125,69.725 43.93,69.725 44.755,68.9 45.3,68.9 v1(45.7,68.5)
DRAM_DQM0: U1.AC3 U2.E7 | length 19.1
  L1 w0.114: U1.AC3@38,40.5 v1(38.4,40.1) ; U2.E7@47.7,32.1 v1(48.1,31.7)
  L8 w0.12: v1(38.4,40.1) 38,39.7 38,39.1 38.2,38.9 39.035,38.9 39.3,39.165 39.3,39.5 39.485,39.685 40.311,39.685 40.8,39.196 41.104,39.196 43.8,36.5 44.1,36.5 44.475,36.875 44.825,36.875 45.1,36.6 45.1,35.1 45.7,34.5 45.7,33.9 45.315,33.515 45.315,33.1 45.515,32.9 45.9,32.9 46.1,32.7 46.1,32.356 46.341,32.115 46.745,32.115 47.16,31.7 v1(48.1,31.7)
DRAM_DQM1: U1.AC6 U2.D3 | length 20.4
  L1 w0.114: v1(37.6,42.5) U1.AC6@38,42.9 ; v1(45.7,28.5) 46.5,28.5 U2.D3@46.9,28.9
  L3 w0.12: v1(37.6,42.5) 37.6,42.4 37.885,42.115 38.554,42.115 38.785,41.884 38.785,41.571 39.071,41.285 39.359,41.285 39.585,41.059 39.585,40.715 40,40.3 40,39.9 40.7,39.2 40.7,38.1 40.9,37.9 40.9,36.996 41.18,36.716 41.18,35.68 42.085,34.775 42.085,31.115 44.7,28.5 v1(45.7,28.5)
DRAM_DQM2: U1.AB8 U3.E7 | length 19.1
  L1 w0.114: U1.AB8@37.2,44.5 v1(37.6,44.1) ; U3.E7@47.7,44.1 v1(48.1,44.5)
  L3 w0.12: v1(37.6,44.1) 37.6,44.3 37.815,44.515 38.559,44.515 38.8,44.756 38.8,45.1 39.015,45.315 39.417,45.315 39.6,45.498 39.6,45.844 39.841,46.085 40.129,46.085 40.385,46.341 40.385,46.685 40.585,46.885 41.215,46.885 41.48,46.62 41.48,45.62 41.7,45.4 43.1,45.4 43.3,45.6 43.3,45.9 43.1,46.1 42.4,46.1 42.2,46.3 42.2,46.65 42.435,46.885 43.115,46.885 43.4,46.6 45,46.6 46.085,45.515 46.085,45.171 46.341,44.915 46.685,44.915 47,44.6 48,44.6 v1(48.1,44.5)
DRAM_DQM3: U1.AE10 U3.D3 | length 15.4
  L1 w0.114: U1.AE10@39.6,46.1 40.4,46.1 v1(40.8,46.5) ; U3.D3@46.9,40.9 v1(47.3,41.3)
  L8 w0.12: v1(40.8,46.5) 41.16,46.86 41.64,46.86 42.4,46.1 43,46.1 43.485,46.585 43.935,46.585 44.22,46.3 44.22,45.436 45.756,43.9 46.7,43.9 46.9,44.1 46.9,44.3 47.1,44.5 47.5,44.5 47.7,44.3 47.7,43.7 48.2,43.2 48.2,41.775 47.725,41.3 v1(47.3,41.3)
DRAM_DQM4: U1.AB18 U4.E7 | length 16.4
  L1 w0.114: U1.AB18@37.2,52.5 v1(37.6,52.9) ; U4.E7@47.7,56.1 v1(48.1,56.5)
  L3 w0.12: v1(37.6,52.9) 38,53.3 38.7,53.3 39.115,52.885 39.435,52.885 39.6,53.05 39.6,54.4 39.9,54.7 40.2,54.7 40.5,55 40.5,55.4 43.6,58.5 45.5,58.5 46.3,57.7 46.715,57.7 46.915,57.5 46.915,57.141 47.141,56.915 47.536,56.915 47.951,56.5 v1(48.1,56.5)
DRAM_DQM5: U1.AC20 U4.D3 | length 14.4
  L1 w0.114: v1(37.6,54.5) U1.AC20@38,54.1 ; U4.D3@46.9,52.9 v1(47.3,53.3)
  L8 w0.12: v1(37.6,54.5) 38.015,54.085 38.015,52.685 38.2,52.5 38.6,52.5 39.1,52 39.6,52 40.285,52.685 40.615,52.685 41.35,51.95 42.35,51.95 42.9,52.5 43.4,52.5 44.1,51.8 44.4,51.8 44.7,52.1 45.5,52.1 46.3,52.9 46.9,52.9 v1(47.3,53.3)
DRAM_DQM6: U1.AD24 U5.E7 | length 21.7
  L1 w0.114: v1(38.4,58.5) 38.4,57.7 U1.AD24@38.8,57.3 ; U5.E7@47.7,68.1 v1(48.1,67.7)
  L8 w0.12: v1(38.4,58.5) 38.5,58.5 38.8,58.8 38.8,61.635 38.965,61.8 39.5,61.8 39.8,62.1 39.8,63.1 39.4,63.5 39.4,64.2 39.8,64.6 40.1,64.6 40.3,64.4 40.3,64 40.5,63.8 40.9,63.8 41.1,64 41.1,65.7 43.3,67.9 43.8,67.9 44.262,67.438 45.938,67.438 46.18,67.68 46.18,67.95 46.38,68.15 46.65,68.15 47,67.8 48,67.8 v1(48.1,67.7)
DRAM_DQM7: U1.Y21 U5.D3 | length 19.1
  L1 w0.114: v1(35.2,55.3) U1.Y21@35.6,54.9 ; v1(46.5,65.3) U5.D3@46.9,64.9
  L3 w0.12: v1(35.2,55.3) 35.585,55.685 36.129,55.685 36.385,55.941 36.385,56.229 36.671,56.515 37.759,56.515 38.015,56.771 38.015,57.059 38.356,57.4 39.465,57.4 40.4,58.335 40.4,58.6 42.2,60.4 ; 42.2,60.407 43.107,60.407 43.372,60.672 44.316,60.672 45.65,62.006 45.65,62.35 45.285,62.715 45.285,64.685 45.515,64.915 46.115,64.915 v1(46.5,65.3)
DRAM_DQS0_N: U1.AD3 U2.G3 | length 19.1
  L1 w0.1: U1.AD3@38.8,40.5 39.077,40.5 39.477,40.1 40.157,40.1 40.68,39.577 40.68,38.792 41.8,37.672 v1(41.8,37.1) ; v1(48.9,28.5) U2.G3@49.3,28.9
  L8 w0.11: v1(41.8,37.1) 41.894,37.006 41.894,36.443 42.48,35.857 42.48,35.448 44.08,33.848 44.08,31.792 45.152,30.72 47.408,30.72 47.72,30.408 47.72,28.908 48.128,28.5 v1(48.9,28.5)
DRAM_DQS0_P: U1.AE3 U2.F3 | length 19.1
  L1 w0.1: U1.AE3@39.6,40.5 39.68,40.42 40.289,40.42 41,39.709 41,38.925 41.2,38.725 41.725,38.725 41.85,38.6 41.85,38.075 42.12,37.805 42.12,37.48 42.4,37.2 v1(42.4,37.1) ; U2.F3@48.5,28.9 v1(48.9,29.3)
  L8 w0.11: v1(42.4,37.1) 42.4,36.972 42.214,36.786 42.214,36.576 42.8,35.99 42.8,35.581 44.4,33.981 44.4,31.925 45.285,31.04 47.541,31.04 48.04,30.541 48.04,30.2 48.327,29.913 48.327,29.527 48.04,29.24 48.04,29.041 48.261,28.82 48.492,28.82 48.9,29.228 v1(48.9,29.3)
DRAM_DQS1_N: U1.AE6 U2.B7 | length 20.5
  L1 w0.1: U1.AE6@39.6,42.9 39.68,42.82 40.929,42.82 41.52,42.229 41.52,41.92 41.866,41.574 41.866,41.266 41.52,40.92 41.52,40.68 41.8,40.4 v1(41.8,40.3) ; U2.B7@45.3,32.1 v1(45.7,31.7)
  L3 w0.11: v1(41.8,40.3) 41.66,40.16 41.66,39.982 42.82,38.822 42.82,37.833 43.12,37.533 43.12,35.533 44.22,34.433 44.22,33.748 43.78,33.308 43.78,32.892 44.28,32.392 44.28,31.092 44.472,30.9 44.7,30.9 44.889,31.089 45.089,31.089 45.289,30.889 45.289,30.689 45.1,30.5 45.1,30.272 45.267,30.105 45.733,30.105 46.18,30.552 46.18,31.314 45.794,31.7 v1(45.7,31.7)
DRAM_DQS1_P: U1.AD6 U2.C7 | length 20.5
  L1 w0.1: U1.AD6@38.8,42.9 39.077,42.9 39.477,42.5 40.797,42.5 41.2,42.097 v1(41.2,40.3) ; U2.C7@46.107,32.093 v1@46.5,31.7
  L3 w0.11: v1(41.2,40.3) 41.34,40.16 41.34,39.849 42.5,38.689 42.5,37.7 42.8,37.4 42.8,35.4 43.9,34.3 43.9,33.881 43.46,33.441 43.46,32.759 43.96,32.259 43.96,30.959 45.134,29.785 45.866,29.785 46.5,30.419 v1(46.5,31.687)
DRAM_DQS2_N: U1.AE8 U3.G3 | length 19.1
  L1 w0.1: U1.AE8@39.6,44.5 39.68,44.42 41.18,44.42 41.45,44.15 41.65,44.15 41.85,44.35 42.075,44.35 42.35,44.075 42.35,43.85 42.15,43.65 42.15,43.45 42.4,43.2 42.941,43.2 43.3,43.559 43.3,44.5 42.8,45 42.8,45.609 43.111,45.92 43.292,45.92 43.572,46.2 v1(43.7,46.2) ; U3.G3@49.3,40.9 v1(49.7,40.5)
  L3 w0.11: v1(43.7,46.2) 43.784,46.116 44.317,46.116 45.3,45.132 45.3,44.2 46.185,43.315 46.534,43.315 46.819,43.6 48,43.6 48.5,43.1 48.5,42.6 49.7,41.4 v1(49.7,40.5)
DRAM_DQS2_P: U1.AD8 U3.F3 | length 19.1
  L1 w0.1: U1.AD8@38.8,44.5 39.077,44.5 39.477,44.1 41.047,44.1 42.267,42.88 43.073,42.88 43.62,43.427 43.62,44.633 43.12,45.133 43.12,45.477 43.243,45.6 v1(43.7,45.6) ; U3.F3@48.5,40.9 v1(48.9,40.5)
  L3 w0.11: v1(43.7,45.6) 43.793,45.6 43.989,45.796 44.184,45.796 44.98,45 44.98,44.067 46.053,42.995 46.666,42.995 46.952,43.28 47.867,43.28 48.18,42.967 48.18,42.467 48.55,42.097 48.55,41.713 48.763,41.5 49.147,41.5 49.38,41.267 49.38,40.873 49.007,40.5 v1(48.9,40.5)
DRAM_DQS3_N: U1.AB10 U3.B7 | length 15.4
  L1 w0.1: U1.AB10@37.2,46.1 v1(37.6,45.7) ; U3.B7@45.3,44.1 45.3,42.491 45.691,42.1 v1(47.2,42.1)
  L8 w0.11: v1(37.6,45.7) 37.704,45.804 38.048,45.804 39.152,44.7 42.7,44.7 45.02,42.38 46.827,42.38 47.107,42.1 v1(47.2,42.1)
DRAM_DQS3_P: U1.AC10 U3.C7 | length 15.4
  L1 w0.1: v1(37.6,46.5) U1.AC10@38,46.1 ; U3.C7@46.1,44.1 45.9,44.1 45.62,43.82 45.62,43.58 45.74,43.46 45.74,43.24 45.62,43.12 45.62,42.623 45.823,42.42 46.792,42.42 47.072,42.7 v1(47.2,42.7)
  L8 w0.11: v1(37.6,46.5) 37.976,46.124 38.18,46.124 39.284,45.02 42.833,45.02 45.153,42.7 v1(47.2,42.7)
DRAM_DQS4_N: U1.AE18 U4.G3 | length 16.4
  L1 w0.1: U1.AE18@39.6,52.5 39.68,52.58 40.195,52.58 40.405,52.37 40.695,52.37 40.905,52.58 41.78,52.58 42.3,53.1 v1(42.3,53.2) ; v1(48.9,52.5) U4.G3@49.3,52.9
  L3 w0.11: v1(42.3,53.2) 42.16,53.34 42.16,53.829 42.466,54.135 42.731,54.135 42.818,54.048 43.018,54.048 43.218,54.248 43.218,54.448 43.131,54.535 43.131,54.8 43.481,55.15 43.969,55.15 44.22,54.899 44.22,53.327 44.652,52.895 45.448,52.895 45.92,53.367 45.92,54.439 46.141,54.66 46.5,54.66 48.43,52.73 48.67,52.73 v1(48.9,52.5)
DRAM_DQS4_P: U1.AD18 U4.F3 | length 16.4
  L1 w0.1: U1.AD18@38.8,52.5 39.07,52.5 39.47,52.9 41.45,52.9 41.7,53.15 v1(41.7,53.2) ; U4.F3@48.5,52.9 v1(48.9,53.3)
  L3 w0.11: v1(41.7,53.2) 41.84,53.34 41.84,53.962 43.348,55.47 44.102,55.47 44.54,55.032 44.54,53.46 44.785,53.215 45.315,53.215 45.6,53.5 45.6,54.572 46.008,54.98 46.633,54.98 48.543,53.07 48.67,53.07 v1(48.9,53.3)
DRAM_DQS5_N: U1.AE20 U4.B7 | length 14.4
  L1 w0.1: U1.AE20@39.6,54.1 39.68,54.18 40.42,54.18 40.683,53.917 41.017,53.917 41.28,54.18 41.58,54.18 42.1,54.7 v1(42.1,54.8) ; U4.B7@45.3,56.1 45.54,55.86 45.54,55.507 45.947,55.1 47.49,55.1 47.69,54.9 47.69,54.74 v1(47.55,54.6)
  L8 w0.11: v1(42.1,54.8) 41.96,54.66 41.96,54.5 42.16,54.3 42.9,54.3 43.1,54.5 43.1,54.875 43.3,55.075 43.6,55.075 43.8,54.875 43.8,54.5 44,54.3 45.709,54.3 45.909,54.5 46.761,54.5 47.161,54.1 47.48,54.1 47.68,54.3 47.68,54.47 v1(47.55,54.6)
DRAM_DQS5_P: U1.AD20 U4.C7 | length 14.4
  L1 w0.1: U1.AD20@38.8,54.1 39,54.1 39.4,54.5 41.35,54.5 41.5,54.65 v1(41.5,54.8) ; U4.C7@46.1,56.1 45.86,55.86 45.86,55.64 46.08,55.42 47.623,55.42 48.01,55.033 48.01,54.74 v1(48.15,54.6)
  L8 w0.11: v1(41.5,54.8) 41.64,54.66 41.64,54.367 42.027,53.98 45.842,53.98 46.042,54.18 46.629,54.18 47.029,53.78 47.613,53.78 48,54.167 48,54.45 v1(48.15,54.6)
DRAM_DQS6_N: U1.AE23 U5.G3 | length 21.7
  L1 w0.1: U1.AE23@39.6,56.5 39.68,56.58 40.28,56.58 40.5,56.8 40.97,56.8 41.15,56.98 41.15,57.45 41.36,57.66 41.36,58.64 40.52,59.48 40.52,59.72 40.8,60 v1(40.8,60.1) ; v1(48.9,64.5) U5.G3@49.3,64.9
  L8 w0.11: v1(40.8,60.1) 40.8,60.193 40.52,60.473 40.52,60.667 41.52,61.667 41.52,62.167 42.033,62.68 43.733,62.68 44.32,63.267 44.32,64.033 43.833,64.52 43.273,64.52 42.91,64.883 42.91,65.317 43.373,65.78 44.02,65.78 44.225,65.575 44.475,65.575 44.68,65.78 47.267,65.78 48.067,64.98 48.52,64.98 48.9,64.6 v1(48.9,64.5)
DRAM_DQS6_P: U1.AD23 U5.F3 | length 21.7
  L1 w0.1: U1.AD23@38.8,56.5 39.077,56.5 39.477,56.9 40.147,56.9 41.04,57.793 41.04,58.507 40.2,59.347 v1(40.2,60.1) ; U5.F3@48.5,64.9 v1(48.9,65.3)
  L8 w0.11: v1(40.2,60.1) 40.2,60.8 41.2,61.8 41.2,62.3 41.9,63 43.6,63 44,63.4 44,63.9 43.7,64.2 43.14,64.2 42.59,64.75 42.59,65.45 43.24,66.1 47.4,66.1 48.2,65.3 v1(48.9,65.3)
DRAM_DQS7_N: U1.AA24 U5.B7 | length 19.2
  L1 w0.1: U1.AA24@36.4,57.3 36.4,57.5 36.8,57.9 36.8,58.847 36.92,58.967 36.92,59.352 39.708,62.14 40.017,62.14 40.4,61.757 v1(40.4,61.7) ; U5.B7@45.3,68.1 45.3,67.3 46.1,66.5 v1(46.8,66.5)
  L3 w0.11: v1(40.4,61.7) 40.48,61.62 41.192,61.62 41.88,62.308 41.88,62.697 43.19,64.007 43.19,65.249 43.813,65.872 45.392,65.872 46.065,66.545 46.755,66.545 v1(46.8,66.5)
DRAM_DQS7_P: U1.AA25 U5.C7 | length 19.2
  L1 w0.1: U1.AA25@36.4,58.1 36.48,58.18 36.48,58.98 36.6,59.1 36.6,59.485 38.9,61.785 38.9,62.15 39.035,62.285 39.4,62.285 39.575,62.46 40.149,62.46 40.394,62.215 40.685,62.215 v1(40.7,62.2) ; U5.C7@46.1,68.1 45.895,68.1 45.62,67.825 45.62,67.433 46.233,66.82 46.42,66.82 46.7,67.1 v1(46.9,67.1)
  L3 w0.11: v1(40.7,62.2) 40.7,62.128 40.888,61.94 41.059,61.94 41.56,62.441 41.56,62.83 42.87,64.14 42.87,65.381 43.68,66.192 45.259,66.192 45.933,66.865 46.425,66.865 46.66,67.1 v1(46.9,67.1)
DRAM_RAS_B: R34.1 U1.AB15 U2.J3 U3.J3 U4.J3 U5.J3 | length 109.6
  L1 w0.114: U1.AB15@37.2,50.1 v1(37.6,50.5) ; U2.J3@50.9,28.9 v1(50.9,29.5) ; U3.J3@50.9,40.9 v1(50.9,41.5) ; U4.J3@50.9,52.9 v1(50.9,53.5) ; U5.J3@50.9,64.9 v1(50.9,65.5) ; v1(52.1,23.2) 52.5,23.6 R34.1@52.635,23.6
  L3 w0.12: v1(47.8,71.6) 47.3,71.1 47.3,70.7 47.5,70.5 49.1,70.5 49.3,70.3 49.3,69.9 49.1,69.7 47.9,69.7 47.7,69.5 47.7,69.1 47.9,68.9 49.9,68.9 50.1,68.7 50.1,68.3 49.9,68.1 48.7,68.1 48.5,67.9 48.5,65.9 48.7,65.7 49.1,65.7 49.3,65.9 49.3,66.5 49.5,66.7 50.7,66.7 50.9,66.5 v1(50.9,65.5) 50.9,65.1 50.58,64.78 50.58,64.38 50.2,64 50.2,63.6 50.58,63.22 50.58,62.78 50,62.2 50,59.3 50.3,59 50.3,56.3 50,56 50,55.434 50.9,54.534 v1(50.9,53.5) 50.9,53.1 50.58,52.78 50.58,52.38 50.2,52 50.2,51.6 50.58,51.22 50.58,50.78 50,50.2 50,47.3 50.3,47 50.3,44.3 50,44 50,43.434 50.9,42.534 v1(50.9,41.5) 50.9,41.1 50.58,40.78 50.58,40.38 50.2,40 50.2,39.6 50.58,39.22 50.58,38.78 50,38.2 50,35.3 50.3,35 50.3,32.3 50,32 50,31.434 50.9,30.534 v1(50.9,29.5) 50.3,28.9 50.3,28.48 50.58,28.2 50.58,26.98 50.38,26.78 50.18,26.78 49.9,26.5 49.9,26 50.115,25.785 50.659,25.785 50.9,25.544 50.9,25 50.7,24.8 50.1,24.8 49.8,24.5 49.8,24.1 50.1,23.8 51.5,23.8 v1(52.1,23.2)
  L10 w0.114: v1(37.6,50.5) 37.815,50.5 38.215,50.9 39.356,50.9 41.256,52.8 41.66,52.8 42.16,52.3 42.5,52.3 43.3,53.1 43.3,54.4 42.9,54.8 42.9,55.1 43.18,55.38 43.48,55.38 43.7,55.6 43.7,56.015 43.465,56.25 43.465,56.435 43.3,56.6 43.3,56.9 43.8,57.4 43.8,58.3 44,58.5 44.25,58.5 44.417,58.668 44.417,59.033 44.235,59.215 43.085,59.215 42.9,59.4 42.9,59.8 43.1,60 44.4,60 44.6,60.2 44.9,60.2 45.1,60.4 45.1,60.8 44.9,61 44.3,61 44.1,61.2 44.1,61.6 44.3,61.8 44.8,61.8 45.1,62.1 45.95,62.1 46.15,62.3 46.15,62.65 45.285,63.515 45.285,64.659 45.059,64.885 44.615,64.885 44.2,65.3 44.2,65.7 44.564,66.064 44.564,67.564 45.3,68.3 45.3,68.644 45.556,68.9 46.7,68.9 46.9,69.1 46.9,69.5 46.7,69.7 46.3,69.7 46.1,69.9 46.1,70.3 46.3,70.5 48.3,70.5 48.5,70.7 48.5,71.156 48.056,71.6 v1(47.8,71.6)
DRAM_RESET_B: R7.2 U1.Y6 U2.T2 U3.T2 U4.T2 U5.T2 | length 101.3
  L1 w0.114: v1(35.2,43.3) U1.Y6@35.6,42.9 ; U2.T2@56.5,28.1 57.1,28.1 57.4,28.4 57.4,28.8 v1(58.1,29.5) ; U3.T2@56.5,40.1 v1(58.1,40.1) ; U4.T2@56.5,52.1 v1(58.1,52.1) ; U5.T2@56.5,64.1 57.1,64.1 57.9,64.9 v1(58.1,64.9)
  L8 w0.12: v1(57.7,71.8) 57.75,71.75 57.75,69.22 58.1,68.87 v1(58.1,64.9) 58.1,59.4 58.9,58.6 58.9,55.9 57.9,54.9 57.9,53.6 58.1,53.4 v1(58.1,52.1) 58.1,51.1 59.135,50.065 59.135,44.135 57.6,42.6 57.6,41.855 58.1,41.355 v1(58.1,40.1) 58.1,39.6 58.3,39.4 58.3,35.444 59.085,34.659 59.085,33.341 58.5,32.756 58.5,31.4 58.1,31 v1(58.1,29.5)
  L10 w0.114: v1(35.2,43.3) 35.456,43.3 35.871,42.885 42.085,42.885 42.515,43.315 47.915,43.315 48.7,44.1 51.956,44.1 53.641,45.785 54.085,45.785 55.015,46.715 55.015,47.759 55.1,47.844 55.1,49.7 55.285,49.885 55.285,50.985 55.685,51.385 55.685,57.085 56.2,57.6 56.2,60.9 56.5,61.2 56.5,65.2 56.815,65.515 56.815,68.659 57.7,69.544 v1(57.7,71.8)
DRAM_SDBA0: R2.1 U1.AC15 U2.M2 U3.M2 U4.M2 U5.M2 | length 109.4
  L1 w0.114: U1.AC15@38,50.1 v1(38.4,50.5) ; v1(52.9,28.5) U2.M2@53.3,28.1 ; v1(52.9,40.5) U3.M2@53.3,40.1 ; v1(52.9,52.5) U4.M2@53.3,52.1 ; v1(52.9,64.5) U5.M2@53.3,64.1 ; R2.1@57.9,23.035 57.9,22.5 v1(58.2,22.2)
  L3 w0.12: v1(50.2,72.6) 50.5,72.6 52.1,71 52.1,66.066 52.5,65.666 52.5,65.3 52.9,64.9 v1(52.9,64.5) 52.778,64.378 52.56,64.378 52.1,63.918 52.1,61.2 51.475,60.575 51.475,60.19 51.9,59.765 51.9,59.3 52.1,59.1 52.1,54.066 52.566,53.6 52.566,53.234 52.9,52.9 v1(52.9,52.5) 52.778,52.378 52.56,52.378 52.1,51.918 52.1,49.2 51.475,48.575 51.475,48.19 51.9,47.765 51.9,47.3 52.1,47.1 52.1,42.066 52.566,41.6 52.566,41.234 52.9,40.9 v1(52.9,40.5) 52.778,40.378 52.56,40.378 52.1,39.918 52.1,37.2 51.475,36.575 51.475,36.19 51.9,35.765 51.9,35.3 52.1,35.1 52.1,30.066 52.566,29.6 52.566,29.134 52.9,28.8 v1(52.9,28.5) 52.5,28.1 52.5,26.4 53,25.9 53,25.256 54.356,23.9 56.5,23.9 v1(58.2,22.2)
  L10 w0.114: v1(38.4,50.5) 39.4,50.5 39.815,50.915 40.041,50.915 40.556,50.4 40.9,50.4 41.115,50.615 41.115,51.515 41.31,51.71 42.77,51.71 43.16,52.1 45.1,52.1 45.5,52.5 45.5,54.1 45.3,54.3 44.9,54.3 44.7,54.1 44.7,53 44.5,52.8 44.1,52.8 43.9,53 43.9,54.8 44.1,55 45.3,55 45.5,55.2 45.5,55.7 46.1,56.3 46.1,56.7 45.885,56.915 44.585,56.915 44.38,57.12 44.38,57.48 44.615,57.715 45.815,57.715 46.1,58 46.1,58.3 46.3,58.5 46.7,58.5 47,58.8 47,59.1 46.8,59.3 46.8,60 47.2,60.4 47.2,60.7 46.8,61.1 46.8,62 47.3,62.5 47.3,63.1 46.9,63.5 46.9,63.844 47.3,64.244 47.3,64.64 47.6,64.94 47.6,65.3 47.215,65.685 45.515,65.685 ; 45.5,65.7 45.285,65.915 45.285,66.215 45.485,66.415 46.185,66.415 46.4,66.63 46.4,66.93 46.2,67.13 45.7,67.13 45.485,67.345 45.485,67.645 45.66,67.82 46.5,67.82 46.82,67.5 47.2,67.5 47.4,67.7 47.4,68.056 48.515,69.171 48.515,69.459 48.741,69.685 49.029,69.685 49.785,70.441 49.785,71.905 50.2,72.32 v1(50.2,72.6)
DRAM_SDBA1: R11.1 U1.Y15 U2.N8 U3.N8 U4.N8 U5.N8 | length 109.5
  L1 w0.114: U1.Y15@35.6,50.1 v1(36,50.5) ; v1(53.7,32.5) U2.N8@54.1,32.9 ; v1(53.7,44.5) U3.N8@54.1,44.9 ; v1(53.7,56.5) U4.N8@54.1,56.9 ; v1(53.7,68.5) U5.N8@54.1,68.9 ; R11.1@56,24.165 56,24.365 56.4,24.765 56.4,25.5 v1(56,25.9)
  L3 w0.12: v1(49.8,75) 49.5,74.7 49.5,74.4 49.7,74.2 50.6,74.2 51,74.6 51.344,74.6 51.885,74.059 51.885,73.685 51.5,73.3 51.5,72.556 51.841,72.215 52.159,72.215 52.4,72.456 52.4,73.1 52.6,73.3 53,73.3 53.2,73.1 53.2,72.456 53.8,71.856 53.8,71 53.6,70.8 53.6,69.8 53.315,69.515 53.315,69.141 53.7,68.756 v1(53.7,68.5) 53.7,65.334 54.1,64.934 54.1,63.5 53.7,63.1 53.7,61.844 53.985,61.559 53.985,61.1 53.625,60.74 53.625,60.275 53.885,60.015 53.885,59.385 53.45,58.95 53.45,58.6 53.7,58.35 53.7,57.844 53.315,57.459 53.315,56.885 v1(53.7,56.5) 53.7,53.334 54.1,52.934 54.1,51.5 53.7,51.1 53.7,49.844 53.985,49.559 53.985,49.1 53.625,48.74 53.625,48.275 53.885,48.015 53.885,47.385 53.45,46.95 53.45,46.6 53.7,46.35 53.7,45.844 53.315,45.459 53.315,44.885 v1(53.7,44.5) 53.7,41.334 54.1,40.934 54.1,39.5 53.7,39.1 53.7,37.844 53.985,37.559 53.985,37.1 53.625,36.74 53.625,36.275 53.885,36.015 53.885,35.385 53.45,34.95 53.45,34.6 53.7,34.35 53.7,33.844 53.315,33.459 53.315,32.885 v1(53.7,32.5) 53.7,31.356 53.544,31.2 53.544,30.856 54.1,30.3 54.1,30.1 53.7,29.7 53.7,29.334 54.2,28.834 54.2,28.3 53.965,28.065 53.965,27.606 54.5,27.071 54.5,26.2 54.9,25.8 55.4,25.8 55.5,25.9 v1(56,25.9)
  L10 w0.114: v1(36,50.5) 36,51.556 36.415,51.971 36.415,53.059 36.641,53.285 36.929,53.285 37.185,53.541 37.185,53.885 37.415,54.115 37.759,54.115 38,54.356 38,55.9 39.2,57.1 39.2,57.9 38.785,58.315 38.785,58.629 39.3,59.144 39.3,59.5 39,59.8 38.1,59.8 37.567,60.333 37.567,61.567 38.433,62.433 38.433,63.933 38.7,64.2 38.7,65.6 39.3,66.2 39.3,67.1 39,67.4 39,68.044 39.2,68.244 39.2,69.956 39.885,70.641 39.885,71.385 40.2,71.7 41.044,71.7 41.285,71.941 41.285,72.685 42.8,74.2 42.8,75.5 43,75.7 43.4,75.7 43.6,75.5 43.6,74.7 43.8,74.5 44.2,74.5 44.4,74.7 44.4,75.5 44.6,75.7 45,75.7 45.2,75.5 45.2,74.7 45.4,74.5 45.8,74.5 46,74.7 46,75.5 46.2,75.7 46.6,75.7 47.3,75 v1(49.8,75)
DRAM_SDBA2: R22.1 U1.AB12 U2.M3 U3.M3 U4.M3 U5.M3 | length 109.6
  L1 w0.114: U1.AB12@37.2,47.7 v1(37.6,47.3) ; U2.M3@53.3,28.9 v1(53.3,29.5) ; U3.M3@53.3,40.9 v1(53.3,41.5) ; U4.M3@53.3,52.9 v1(53.3,53.5) ; U5.M3@53.3,64.9 v1(53.3,65.5) ; v1(59.2,24.2) 59.465,24.465 R22.1@59.7,24.465
  L3 w0.12: v1(52.8,72.6) 52.8,72.46 53,72.26 53,71.434 53.285,71.149 53.285,69.885 52.9,69.5 52.9,69.16 53.315,68.745 53.315,68.315 52.9,67.9 52.9,67.3 53.3,66.9 53.3,66.7 53,66.4 53,66.1 53.3,65.8 v1(53.3,65.5) 53.3,65.296 53.6,64.996 53.6,63.7 52.9,63 52.9,62.2 53.2,61.9 53.2,61.2 53.1,61.1 53.1,58.5 53.38,58.22 53.38,57.92 52.9,57.44 52.9,56.9 53.2,56.6 53.2,55.944 52.9,55.644 52.9,54.8 53.3,54.4 v1(53.3,53.5) 53.3,53.296 53.6,52.996 53.6,51.7 52.9,51 52.9,50.2 53.2,49.9 53.2,49.2 53.1,49.1 53.1,46.5 53.38,46.22 53.38,45.92 52.9,45.44 52.9,44.9 53.2,44.6 53.2,43.944 52.9,43.644 52.9,42.8 53.3,42.4 v1(53.3,41.5) 53.3,41.296 53.6,40.996 53.6,39.7 52.9,39 52.9,38.2 53.2,37.9 53.2,37.2 53.1,37.1 53.1,34.5 53.38,34.22 53.38,33.92 52.9,33.44 52.9,32.9 53.2,32.6 53.2,31.944 52.9,31.644 52.9,30.8 53.3,30.4 v1(53.3,29.5) 53.3,29.282 53.62,28.962 53.62,27.498 53.7,27.418 53.7,26.444 54.585,25.559 54.585,25.271 54.841,25.015 55.315,25.015 55.7,25.4 56.166,25.4 57.766,23.8 58.8,23.8 v1(59.2,24.2)
  L10 w0.114: v1(37.6,47.3) 38,47.7 38,48.3 38.2,48.5 38.6,48.5 38.8,48.3 38.8,47.9 39,47.7 39.4,47.7 39.6,47.9 39.6,48.3 39.785,48.485 42.115,48.485 42.6,48 45.7,48 46.1,48.4 46.715,48.4 46.915,48.6 50,48.6 50.22,48.82 50.22,49.266 50.066,49.42 49.78,49.42 49.09,50.11 49.09,50.5 49.3,50.71 49.3,51.1 49.1,51.3 48.71,51.3 48.5,51.51 48.5,51.9 48.7,52.1 49.1,52.1 49.3,52.3 49.3,52.7 49.485,52.885 49.9,52.885 50.2,53.185 50.2,54 50.4,54.2 50.7,54.2 50.956,54.456 50.956,54.83 50.713,55.073 50.383,55.073 50.015,55.441 50.015,55.815 50.215,56.015 50.6,56.015 50.8,56.215 50.8,56.615 50.6,56.815 50.325,56.815 50.115,57.025 50.115,57.415 50.315,57.615 50.615,57.615 50.815,57.815 50.815,58.215 50.615,58.415 50.465,58.415 50.265,58.615 50.265,59.015 50.465,59.215 51.159,59.215 51.385,59.441 51.385,60.326 50.515,61.196 50.515,61.615 50.9,62 50.9,64.7 51.3,65.1 51.3,65.8 52,66.5 52,67 51.7,67.3 51.7,67.9 52.254,68.454 52.254,68.954 52.515,69.215 52.515,70.315 52.7,70.5 53.1,70.5 53.4,70.8 53.4,71.056 53,71.456 53,71.9 52.8,72.1 v1(52.8,72.6)
DRAM_SDCKE0: R6.2 R45.1 U1.Y11 U2.K9 U3.K9 U4.K9 U5.K9 | length 109.5
  L1 w0.114: v1(35.2,47.3) U1.Y11@35.6,46.9 ; v1(51.3,25.4) 51.5,25.2 R45.1@51.5,24.865 ; v1(51.3,34.1) U2.K9@51.7,33.7 ; v1(51.3,46.1) U3.K9@51.7,45.7 ; v1(51.3,58.1) U4.K9@51.7,57.7 ; v1(51.3,70.1) U5.K9@51.7,69.7
  L3 w0.12: v1(45.4,70.8) 45.8,70.8 46.1,70.5 46.1,69.3 46.3,69.1 46.7,69.1 46.885,69.285 46.885,70.723 46.615,70.993 46.615,71.8 46.815,72 47.215,72 47.415,72.2 47.415,72.885 47.615,73.085 48.015,73.085 48.215,72.885 48.215,71.085 48.435,70.865 49.235,70.865 49.6,70.5 49.6,69.885 49.785,69.7 50.1,69.7 50.8,70.4 51.1,70.4 51.3,70.2 v1(51.3,70.1) 51.3,69.844 50.9,69.444 50.9,68.8 50.625,68.525 50.625,67.919 50.8,67.744 50.8,67.1 51.3,66.6 51.3,65.066 50.9,64.666 50.9,62.5 50.4,62 50.4,59.515 51.3,58.615 v1(51.3,58.1) 51.3,57.844 50.9,57.444 50.9,56.8 50.625,56.525 50.625,55.919 50.8,55.744 50.8,55.1 51.3,54.6 51.3,53.066 50.9,52.666 50.9,50.5 50.4,50 50.4,47.515 51.3,46.615 v1(51.3,46.1) 51.3,45.844 50.9,45.444 50.9,44.8 50.625,44.525 50.625,43.919 50.8,43.744 50.8,43.1 51.3,42.6 51.3,41.066 50.9,40.666 50.9,38.5 50.4,38 50.4,35.515 51.3,34.615 v1(51.3,34.1) 50.8,33.6 50.8,31.1 51.3,30.6 51.3,29.044 51.7,28.644 51.7,28.356 51.459,28.115 51.17,28.115 50.9,27.844 50.9,26.9 51.725,26.075 51.725,25.6 51.525,25.4 v1(51.3,25.4)
  L10 w0.114: v1(35.2,47.3) 35.465,47.565 R6.2@35.8,47.565 36.065,47.565 36.405,47.905 36.405,49.905 36.615,50.115 36.959,50.115 37.185,50.341 37.185,50.629 37.471,50.915 37.759,50.915 38.015,51.171 38.015,51.56 38.17,51.715 38.58,51.715 38.965,52.1 39.5,52.1 41.1,53.7 41.1,55.41 42,56.31 42,57.4 42.2,57.6 42.9,57.6 43.1,57.8 43.1,58.2 42.915,58.385 42.315,58.385 42.1,58.6 42.1,59.9 42.4,60.2 42.4,60.7 42,61.1 42,62 42.28,62.28 42.88,62.28 43.085,62.485 43.085,62.815 42.885,63.015 42.185,63.015 42,63.2 42,63.6 42.2,63.8 42.704,63.8 43,64.096 43,64.4 42.8,64.6 42,64.6 41.5,65.1 41.5,65.4 42.1,66 43.7,66 43.885,66.185 43.885,66.515 43.685,66.715 42.685,66.715 42.5,66.9 42.5,67.3 42.7,67.5 43.7,67.5 43.885,67.685 43.885,67.97 43.415,68.441 43.415,68.815 43.7,69.1 43.7,70.7 43.9,70.9 44.3,70.9 44.5,70.7 44.5,69.9 44.7,69.7 45.2,69.7 45.4,69.9 v1(45.4,70.8)
DRAM_SDODT0: R77.1 U1.AC16 U2.K1 U3.K1 U4.K1 U5.K1 | length 109.5
  L1 w0.114: U1.AC16@38,50.9 v1(38.4,51.3) ; R77.1@51.6,23.035 51.6,22.5 v1(51.9,22.2) ; U2.K1@51.7,27.3 v1(52.1,27.7) ; v1(51.7,38.7) U3.K1@51.7,39.3 ; v1(51.7,50.7) U4.K1@51.7,51.3 ; v1(51.7,62.7) U5.K1@51.7,63.3
  L8 w0.12: v1(49.4,72.6) 49.8,73 50.5,73 51,72.5 51,72.1 51.4,71.7 51.4,70.8 51.7,70.5 51.7,67.234 51.9,67.034 51.9,66.1 51.7,65.9 v1(51.7,62.7) 51.7,61.966 51.3,61.566 51.3,60.3 51.525,60.075 51.525,59.581 51.2,59.256 51.2,58.744 51.7,58.244 51.7,54 51.3,53.6 51.3,53.2 51.7,52.8 51.7,52.356 52.15,51.906 52.15,51.65 51.7,51.2 v1(51.7,50.7) 51.7,49.966 51.3,49.566 51.3,48.3 51.525,48.075 51.525,47.581 51.2,47.256 51.2,46.744 51.7,46.244 51.7,42 51.3,41.6 51.3,41.2 51.7,40.8 51.7,40.356 52.15,39.906 52.15,39.65 51.7,39.2 v1(51.7,38.7) 51.7,37.966 51.3,37.566 51.3,36.2 51.7,35.8 51.7,35.4 51.5,35.2 51.1,35.2 50.915,35.015 50.915,33.885 51.1,33.7 51.5,33.7 51.7,33.5 51.7,31.1 51.98,30.82 51.98,30.28 51.8,30.1 51.5,30.1 51.285,29.885 51.285,29.215 51.7,28.8 51.7,28.356 52.1,27.956 v1(52.1,27.7) 52.1,27 51.926,26.826 51.626,26.826 51.4,26.6 51.4,26.3 51.6,26.1 51.8,26.1 52.05,25.85 52.05,25.55 51.45,24.95 51.45,24.65 51.7,24.4 52.7,24.4 52.9,24.2 52.9,23.8 52.7,23.6 51.235,23.6 51.035,23.4 51.035,23 51.235,22.8 51.7,22.8 51.9,22.6 v1(51.9,22.2)
  L10 w0.114: v1(38.4,51.3) 38.656,51.3 39.056,51.7 39.6,51.7 41.5,53.6 41.5,53.9 41.7,54.1 42,54.1 42.5,53.6 42.8,53.6 43,53.8 43,54.304 42.504,54.8 42.504,55.395 42.779,55.67 42.97,55.67 43.185,55.885 43.185,56.285 42.985,56.485 42.485,56.485 42.3,56.67 42.3,57.07 42.5,57.27 43.17,57.27 43.4,57.5 43.4,58.7 43.2,58.9 42.8,58.9 42.5,59.2 42.5,59.9 42.9,60.3 43.9,60.3 44.1,60.5 44.1,60.8 43.9,61 ; 43.885,61.015 42.485,61.015 42.3,61.2 42.3,61.8 42.5,62 43.056,62 43.656,62.6 43.967,62.6 44.067,62.5 45.144,62.5 45.344,62.7 45.344,63.06 45.104,63.3 43.4,63.3 43.2,63.5 43.2,63.9 43.4,64.1 44.2,64.1 44.4,64.3 44.4,64.7 44.2,64.9 42.5,64.9 42.3,65.1 42.3,65.5 42.5,65.7 43.8,65.7 44.196,66.096 44.196,68.641 44.455,68.9 45.16,68.9 45.8,69.54 45.8,70.6 46.107,70.908 47.207,70.908 47.4,71.1 47.4,71.9 47.7,72.2 49,72.2 v1(49.4,72.6)
DRAM_WE_B: R42.1 U1.AB16 U2.L3 U3.L3 U4.L3 U5.L3 | length 109.5
  L1 w0.114: U1.AB16@37.2,50.9 v1(37.6,51.3) ; v1(52.1,29.3) U2.L3@52.5,28.9 ; v1(52.1,41.3) U3.L3@52.5,40.9 ; v1(52.1,53.3) U4.L3@52.5,52.9 ; v1(52.1,65.3) U5.L3@52.5,64.9 ; R42.1@52.635,22.9 52.635,22.365 v1(52.8,22.2)
  L8 w0.12: v1(49,74) 49,74.4 49.2,74.6 50,74.6 50.2,74.4 50.2,73.944 51.31,72.834 51.31,72.29 51.8,71.8 51.8,70.9 52.1,70.6 52.1,67.334 52.5,66.934 52.5,66.1 52.1,65.7 v1(52.1,65.3) 52.5,64.9 52.5,63.5 52.1,63.1 52.1,61.2 51.6,60.7 51.6,60.4 52,60 52,59.6 51.575,59.175 51.575,58.775 52.1,58.25 52.1,55.2 52.36,54.94 52.36,54.36 52.1,54.1 v1(52.1,53.3) 52.5,52.9 52.5,51.5 52.1,51.1 52.1,49.2 51.6,48.7 51.6,48.4 52,48 52,47.6 51.575,47.175 51.575,46.775 52.1,46.25 52.1,43.2 52.36,42.94 52.36,42.36 52.1,42.1 v1(52.1,41.3) 52.5,40.9 52.5,39.5 52.1,39.1 52.1,37.2 51.6,36.7 51.6,36.4 52,36 52,35.2 51.575,34.775 51.575,34.425 52.1,33.9 52.1,31.2 52.36,30.94 52.36,29.96 52.1,29.7 v1(52.1,29.3) 52.1,29.1 52.5,28.7 52.5,26.044 53,25.544 53,25.226 53.226,25 53.6,25 53.8,24.8 53.8,24.4 53.6,24.2 53.45,24.2 53.25,24 53.25,23.6 53.45,23.4 54.1,23.4 54.3,23.2 54.3,22.8 54.1,22.6 53.2,22.6 v1(52.8,22.2)
  L10 w0.114: v1(37.6,51.3) 37.725,51.425 37.725,51.681 38,51.956 38,52.244 38.271,52.515 38.559,52.515 38.785,52.741 38.941,52.741 39.7,53.5 39.7,54.2 40.4,54.9 40.4,55.5 40,55.9 40,56.3 40.2,56.5 41.1,56.5 41.3,56.7 41.3,57.1 41.1,57.3 40.55,57.3 40.35,57.5 40.35,57.9 40.55,58.1 41.3,58.1 41.5,58.3 41.5,60.7 41.185,61.015 41.185,62.415 40.6,63 40.6,64.4 40.1,64.9 40.1,65.3 41.2,66.4 41.6,66.4 41.9,66.7 41.9,67.6 42.35,68.05 42.35,68.36 42.21,68.5 41.8,68.5 41.6,68.7 41.6,69.1 41.8,69.3 42.8,69.3 43,69.5 43,69.9 42.8,70.1 41.6,70.1 41.4,70.3 41.4,70.7 41.6,70.9 42.8,70.9 43,71.1 43,71.5 42.8,71.7 42.5,71.7 42.3,71.9 42.3,72.3 42.5,72.5 42.9,72.5 43.1,72.7 43.1,73.1 43.3,73.3 43.7,73.3 43.9,73.1 43.9,72.6 44.1,72.4 44.5,72.4 44.7,72.6 44.7,73.3 44.9,73.5 45.3,73.5 45.5,73.3 ; 45.5,73.309 45.5,72.55 45.67,72.38 46.13,72.38 46.3,72.55 46.3,73 46.6,73.3 47.8,73.3 48.2,72.9 48.744,72.9 49.2,73.356 49.2,73.8 v1(49,74)
EEPROM_WP: R114.1 R115.1 U18.7 | length 3.8
  L1 w0.114: v1(61.2,36.2) 61.6,36.6 R114.1@61.6,37.6 R115.1@61.6,39
  L10 w0.114: U18.7@61.175,35.4 61.175,36.175 v1(61.2,36.2)
EN_1V375: R340.1 R341.1 U30.5 | length 17.5
  L8 w0.12: v1(12.3,31.9) 12.7,31.5 14.4,31.5 14.865,31.035 14.865,30.735 15.085,30.515 15.885,30.515 v1(16,30.4)
  L10 w0.114: v1(12.3,31.9) 12.3,32.1 12.45,32.25 U30.5@12.79,32.25 U30.5@12.9,32.25 ; v1(16,30.4) 16.1,30.3 19.7,30.3 20.2,29.8 R341.1@20.8,29.8 21.492,30.492 21.992,30.492 22.685,31.185 23.159,31.185 23.544,30.8 24.2,30.8 24.485,30.515 25.415,30.515 26.1,31.2 R340.1@26.8,31.2
EN_3V3_HDR: R403.2 R404.1 U36.5 | length 6.9
  L10 w0.114: R404.1@8.3,85.8 8.3,86 8.702,86.402 10.202,86.402 R403.2@10.5,86.7 10.5,87.1 10.7,87.3 11.756,87.3 12.1,87.644 12.1,88.6 12.5,89 U36.5@12.5,89.45
ENET_LED_LINK: J6.13 R81.2 | length 20.9
  L3 w0.12: J6.13@8.682,90.007 8.975,90.3 13.4,90.3 14,89.7 14,89.3 14.785,88.515 14.785,84.885 v1(14.4,84.5)
  L10 w0.114: R81.2@8,79.5 8,79.6 9.567,81.167 12.763,81.167 14.1,82.504 14.1,84.2 v1(14.4,84.5)
ENET_LED_RX: R82.2 R287.2 R288.2 | length 5.3
  L10 w0.114: R287.2@25.456,88.5 25.6,88.5 26.4,89.3 R82.2@26.4,89.8 26.4,92.1 R288.2@25.5,93
ENET_LED_RX_G: J6.17 R288.1 | length 2.4
  L10 w0.114: J6.17@23.718,92.547 25.171,94 R288.1@25.5,94
ENET_LED_RX_O: J6.15 R287.1 | length 1.8
  L10 w0.114: J6.15@23.718,87.467 25.467,87.467 R287.1@25.5,87.5
ENET_REF_CLK: R181.2 U1.V22 | length 26.7
  L1 w0.114: R181.2@22.1,65.4 22.6,65.4 23.15,64.85 24.65,64.85 25,64.5 25,63.6 25.2,63.4 25.6,63.4 25.8,63.6 25.8,64.5 26,64.7 26.4,64.7 26.6,64.5 26.6,63.6 26.8,63.4 27.2,63.4 27.4,63.6 27.4,64.2 27.59,64.39 ; 27.585,64.395 27.59,64.4 v1(29.1,64.4) ; U1.V22@34,55.7 v1(34.4,56.1)
  L10 w0.114: v1(29.1,64.4) 28.7,64 28.7,63.456 29.256,62.9 32.8,62.9 33.1,62.6 34.3,62.6 35.3,61.6 35.3,60 35.585,59.715 35.585,57.425 35.46,57.3 35.015,57.3 34.815,57.1 34.815,56.515 v1(34.4,56.1)
ENET_REF_CLK_R: R30.2 R181.1 U7.41 | length 3.1
  L1 w0.114: U7.41@19.04,66.35 19.5,66.35 19.65,66.5 20,66.5 20.1,66.4 R30.2@20.7,66.4 ; R30.2@20.75,66.45 20.8,66.4 R181.1@22.1,66.4
ETH_ISET: R84.1 U7.48 | length 1.7
  L1 w0.25: U7.48@19.04,69.85 19.25,69.85 v1(19.7,70.3)
  L10 w0.4: R84.1@18.9,70.5 19.5,70.5 v1(19.7,70.3)
ETH_OSCI_25MHZ: C175.1 U7.46 Y3.3 | length 4.9
  L1 w0.114: U7.46@19.04,68.85 19.85,68.85 20.1,69.1 20.1,70.1 20.6,70.6 21.45,70.6 Y3.3@22.25,71.4
ETH_OSCO_25MHZ: C176.1 U7.45 Y3.1 | length 6.3
  L1 w0.114: U7.45@19.04,68.35 19.75,68.35 C176.1@20.8,69.4 20.8,69.6 21.5,70.3 22.85,70.3 Y3.1@23.95,69.2